# Altium PCB Electrode_Ribbon_PCB_v3.1.PcbDoc (part 1 of 5)
Units mil, origin at the board's own origin, x right, y up, seen from the top; angles counter-clockwise.
Board outline 8303.83 x 5482.84 mil, 2 copper layers (Top Layer, Bottom Layer), stack 3.556 mil thick; 265 components, 171 nets, 720 pads, 346 vias.
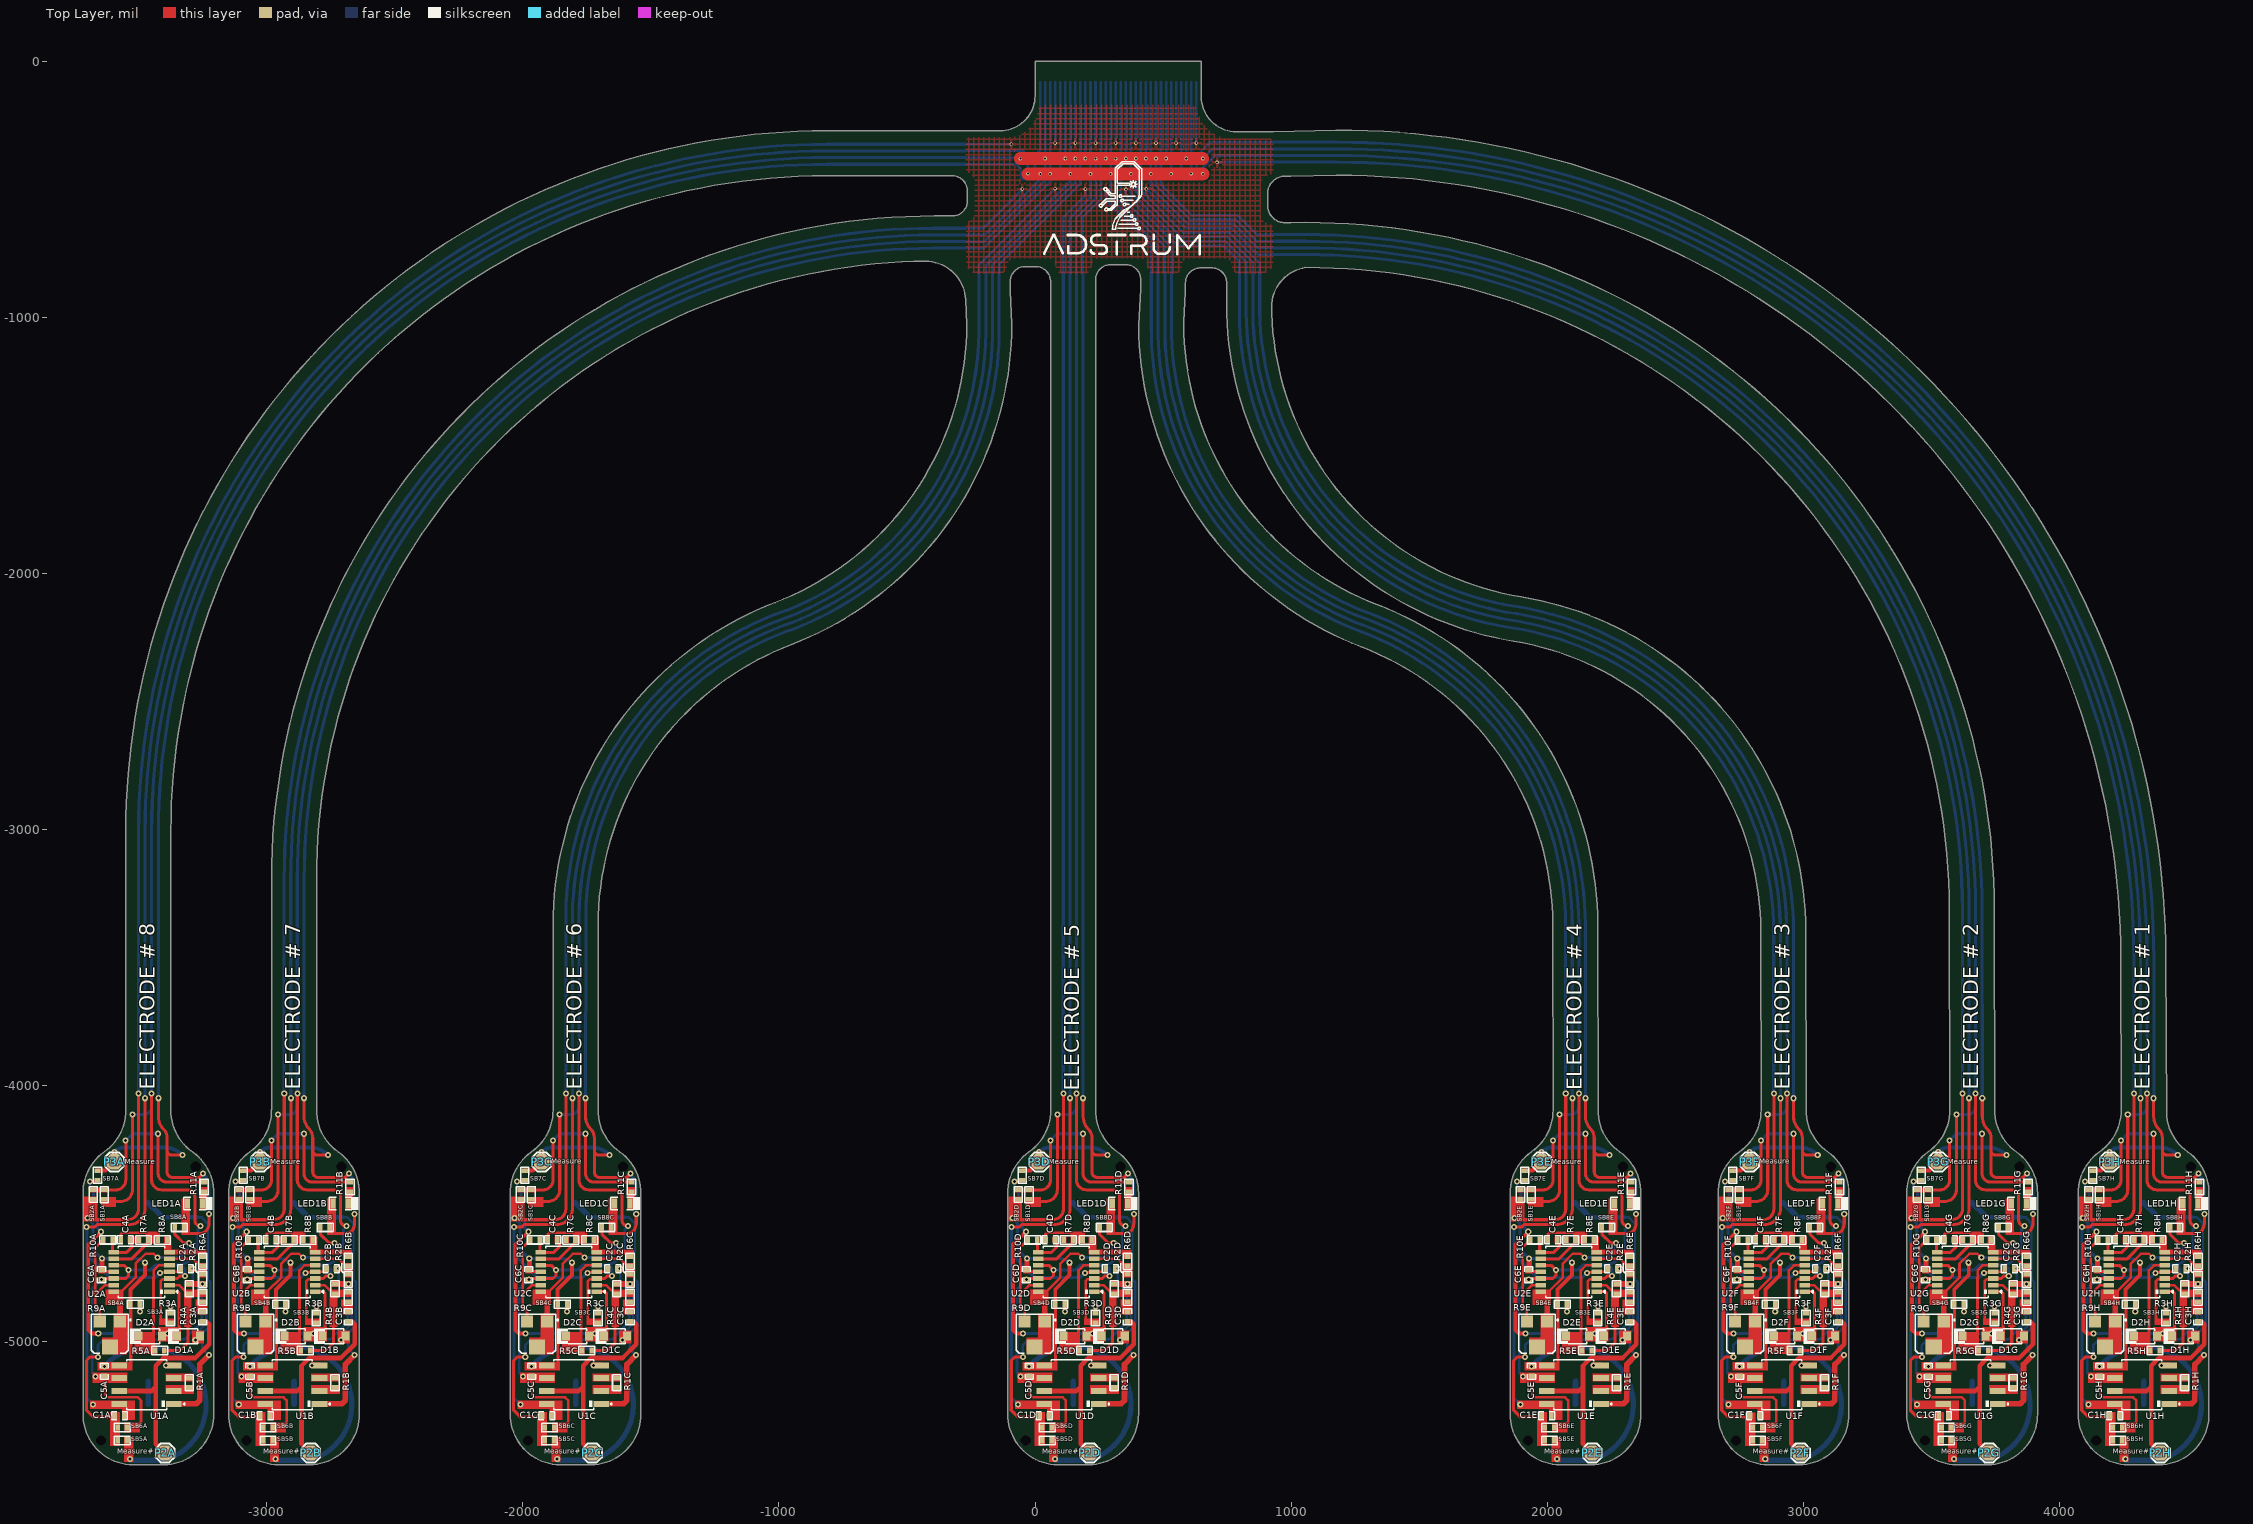
[diagram p0: Top Layer view]
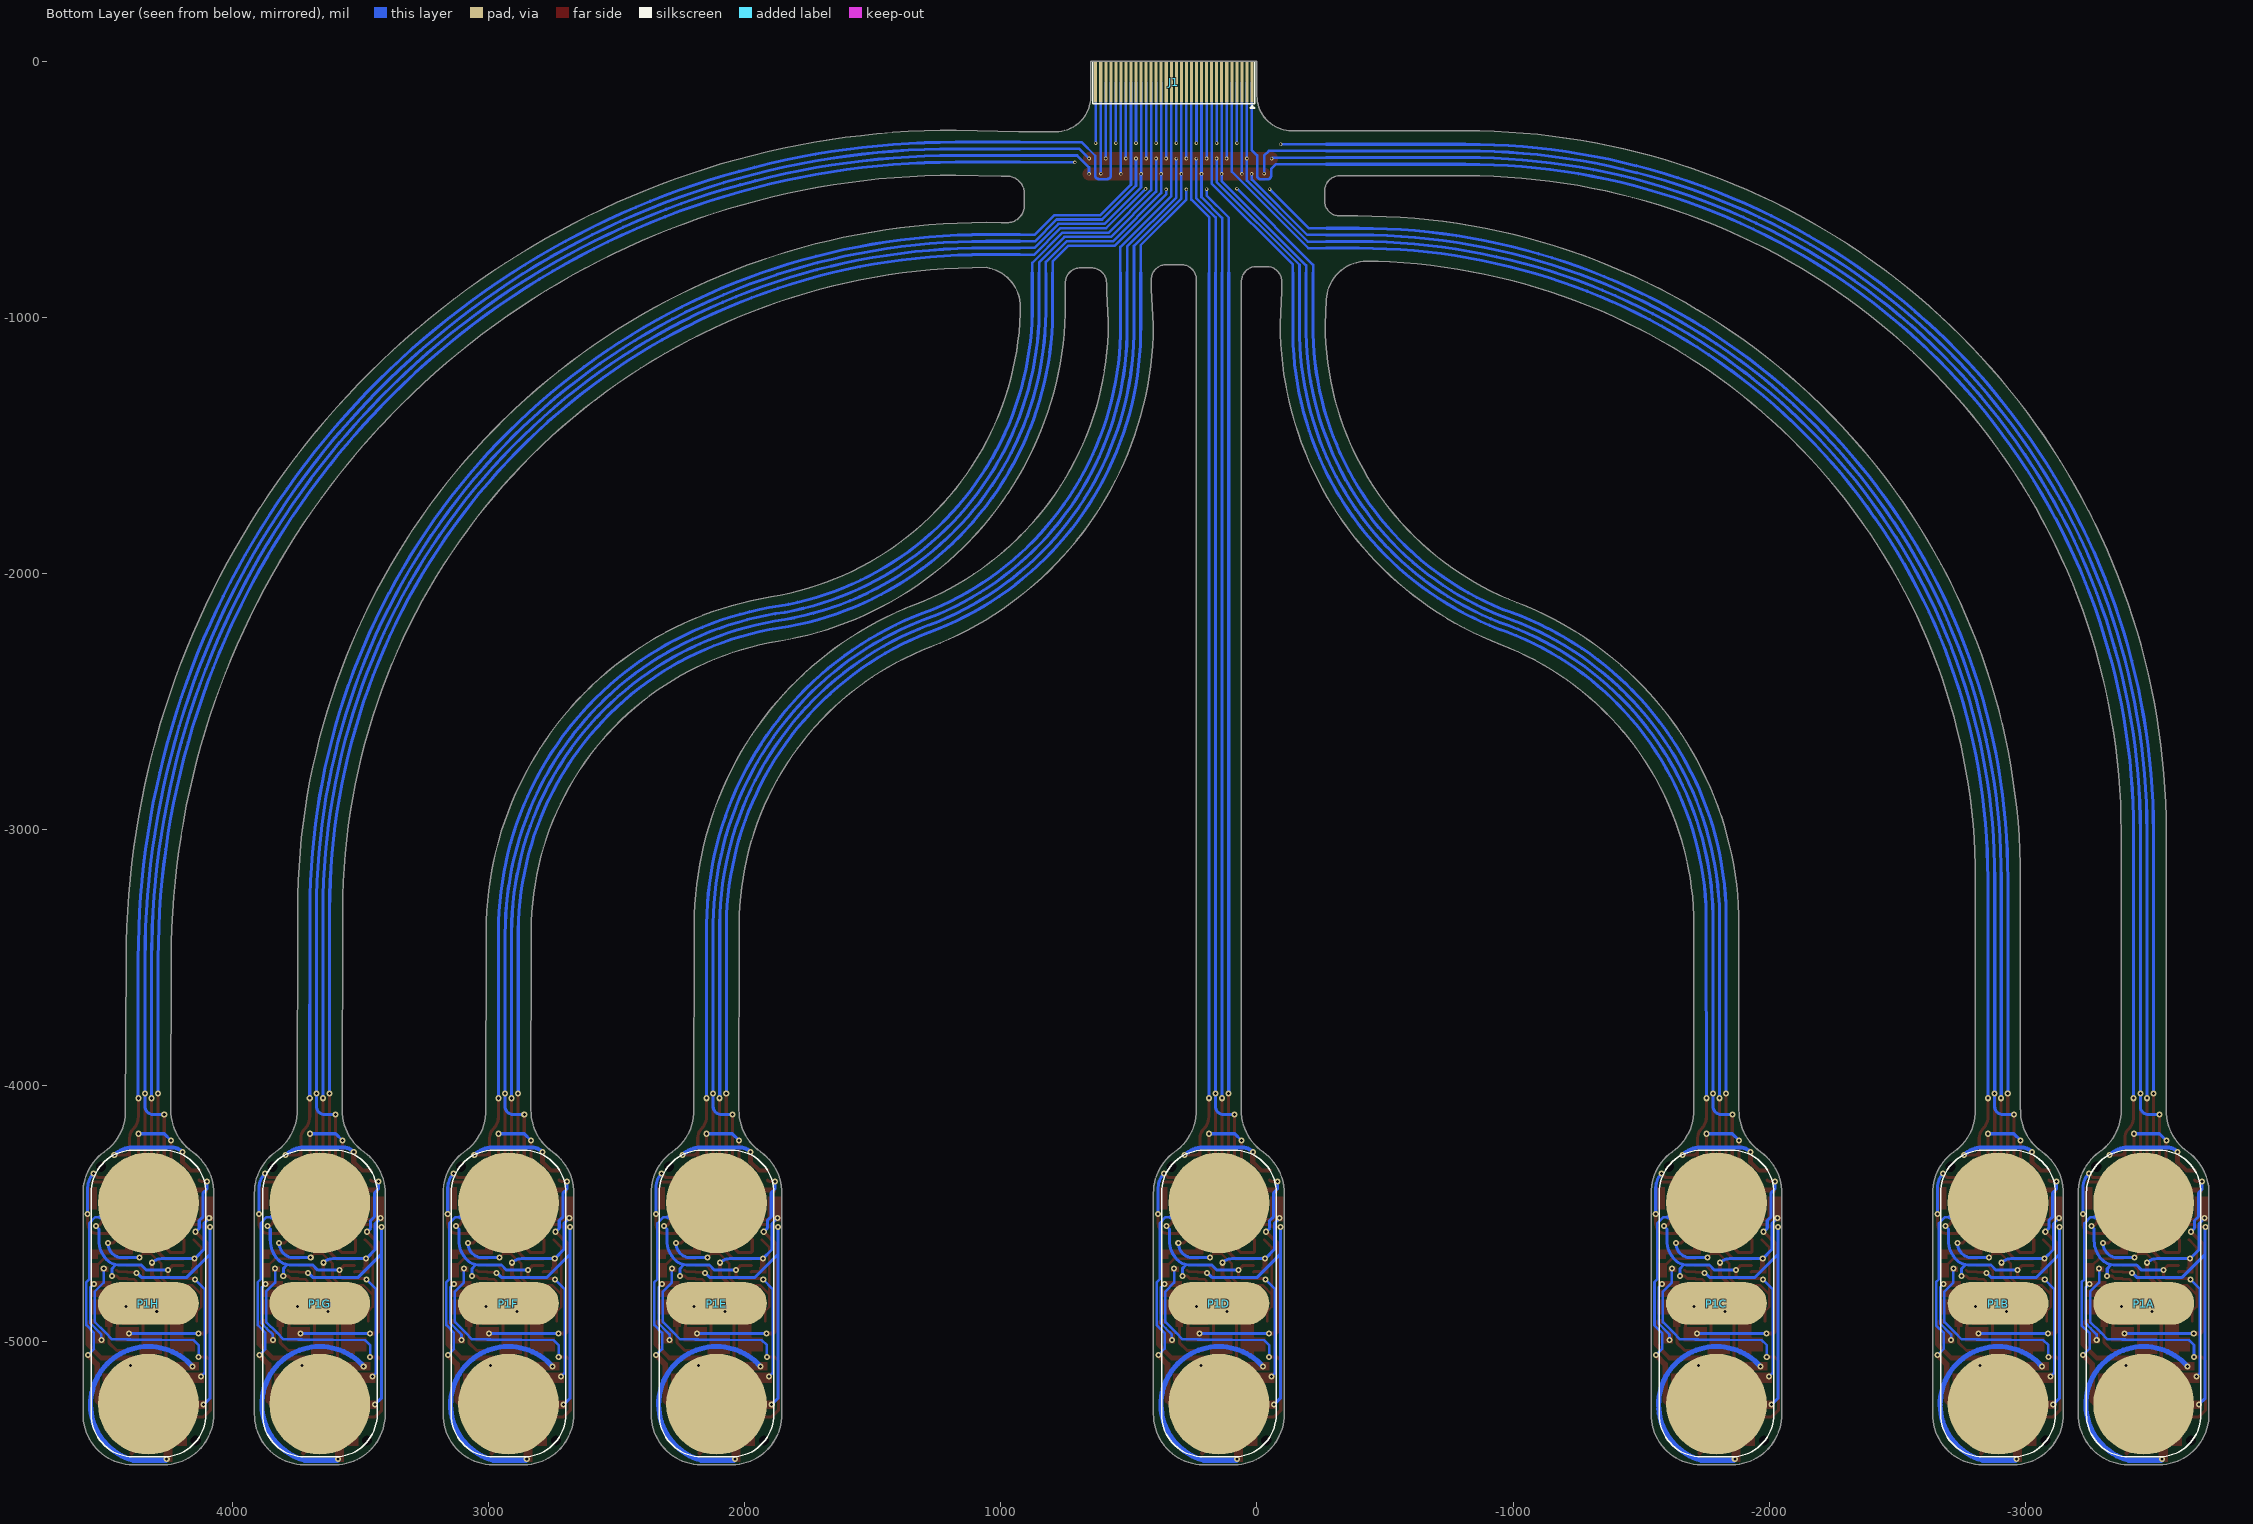
[diagram p1: Bottom Layer view, seen from below]
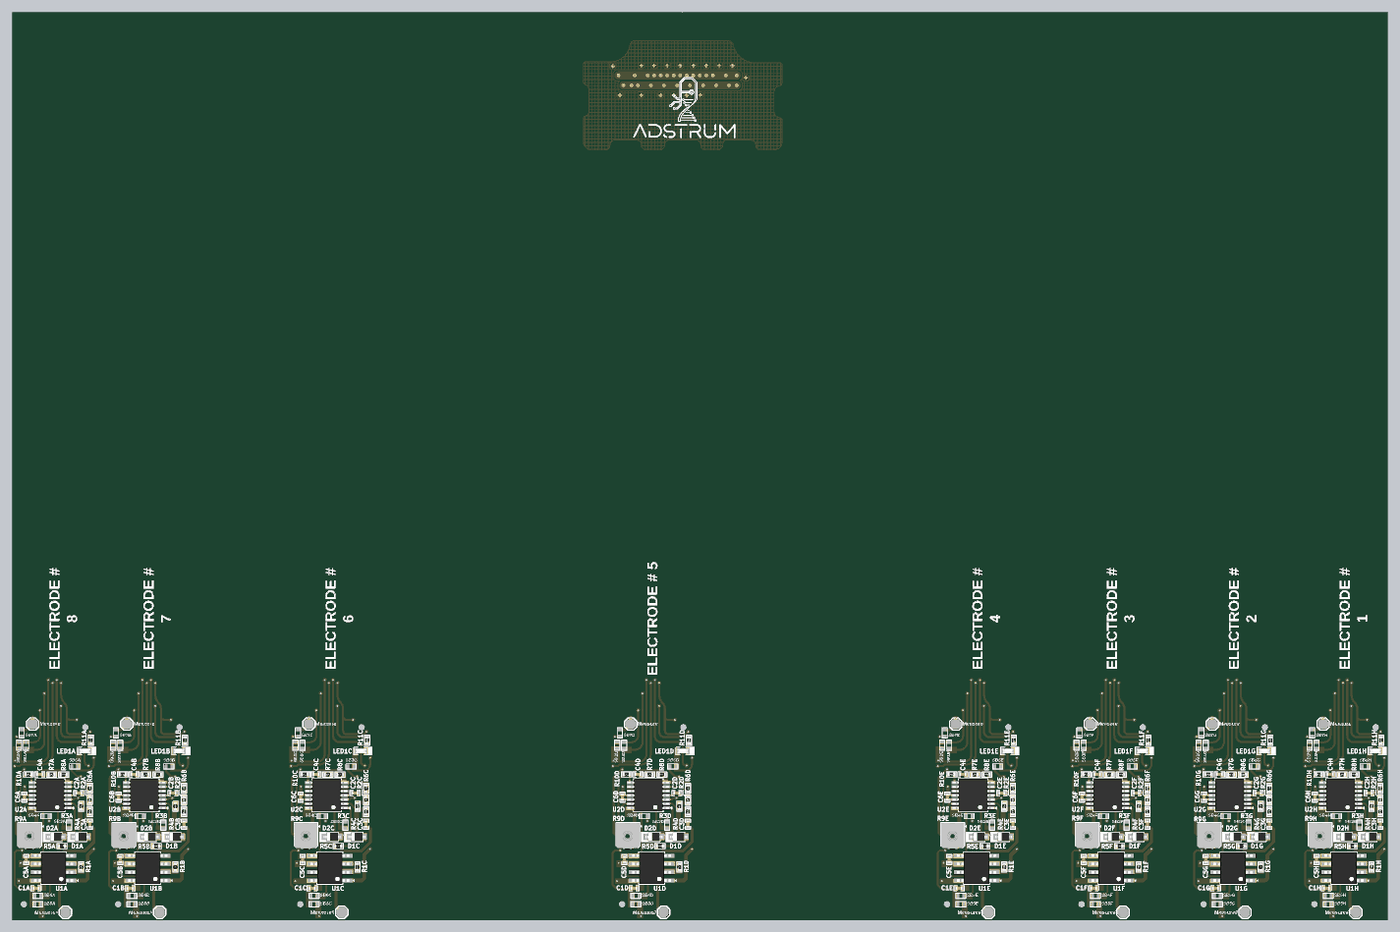
[diagram p5: 3D render of the assembled board from above, using the file's embedded part models]

## Layer stack, top to bottom
Top Solder: solder mask 0.5, Solder Resist, Dk 3.5
Top Layer: signal copper 1.378
Dielectric 1: dielectric 0.8, Flex, Dk 4.8
Bottom Layer: signal copper 1.378
Bottom Solder: solder mask 0.5, Solder Resist, Dk 3.5

## Board outline
-2833.54,-5482.84 ccw(c-2835.75,-5286) -2638.92,-5283.79 -2638.92,-4423.32 ccw(c-2835.73,-4421.11) -2720.72,-4261.39 -2720.78,-4261.47 cw(c-2609.33,-4099.22) -2764.51,-4220.31 cw(c-2609.34,-4099.22) -2806.15,-4097.01 -2806.16,-4097.01 -2806.16,-3194.47 cw(c-392.86,-3194.47) -519.84,-784.51 cw(c-413.65,-3194.12) -428.89,-782.22 cw(c-427.89,-939.69) -270.55,-933.27 -266.62,-1029.33 cw(c-1432.71,-1026.15) -1015.45,-2115.03 ccw(c-532.36,-3375.64) -1882.37,-3375.61 -1882.37,-4097.01 -1882.38,-4097.01 cw(c-2079.19,-4099.22) -1967.75,-4261.46 -1967.81,-4261.39 ccw(c-1852.8,-4421.11) -2049.61,-4423.33 -2049.62,-5283.78 ccw(c-1852.78,-5286) -1854.99,-5482.84 -1733.76,-5482.84 ccw(c-1735.97,-5286) -1539.13,-5283.79 -1539.13,-4423.32 ccw(c-1735.95,-4421.11) -1620.93,-4261.39 -1620.99,-4261.47 cw(c-1509.55,-4099.22) -1664.73,-4220.31 cw(c-1509.55,-4099.22) -1706.37,-4097.01 -1706.38,-4097.01 -1706.38,-3375.61 cw(c-532.36,-3375.64) -952.48,-2279.36 ccw(c-1432.71,-1026.15) -90.63,-1027.62 -90.63,-1025.87 -95.84,-898.28 -96.25,-854.66 cw(c-37.62,-861.7) -37.62,-802.64 1.79,-802.64 cw(c1.79,-861.7) 60.42,-854.66 60.84,-856.23 60.84,-861.23 60.84,-861.7 60.84,-877.23 61.11,-4097.01 cw(c-135.71,-4099.22) 19.46,-4220.31 cw(c-135.71,-4099.22) -24.27,-4261.46 -24.33,-4261.38 ccw(c90.69,-4421.11) -106.13,-4423.33 -106.14,-5283.78 ccw(c90.7,-5286) 88.49,-5482.84 209.72,-5482.84 ccw(c207.51,-5286) 404.35,-5283.79 404.35,-4423.32 ccw(c207.53,-4421.11) 322.55,-4261.38 322.48,-4261.45 cw(c433.91,-4099.24) 278.76,-4220.31 cw(c433.91,-4099.23) 237.12,-4097.02 236.83,-890.88 236.83,-851.19 237.25,-847.26 cw(c295.88,-854.3) 295.88,-795.24 353.84,-795.24 cw(c353.84,-854.3) 412.47,-847.26 412.14,-890.88 404.35,-1030.77 404.38,-1033.77 ccw(c1761.31,-1021.43) 1274.07,-2287.93 1274.18,-2287.97 cw(c857.44,-3375.43) 2022.01,-3373.45 2023.27,-4097.01 cw(c1826.45,-4099.22) 1937.89,-4261.46 1937.84,-4261.38 ccw(c2052.85,-4421.11) 1856.03,-4423.33 1856.03,-5283.78 ccw(c2052.87,-5286) 2050.65,-5482.84 2171.89,-5482.84 ccw(c2169.68,-5286) 2366.52,-5283.79 2366.52,-4423.32 ccw(c2169.7,-4421.11) 2284.71,-4261.39 2284.66,-4261.47 cw(c2396.1,-4099.22) 2240.92,-4220.31 cw(c2396.1,-4099.22) 2199.28,-4097.01 2199.26,-4097.01 2198,-3373.14 ccw(c857.44,-3375.43) 1337.16,-2123.64 cw(c1761.31,-1021.43) 601.94,-1246.45 cw(c1770.23,-1025.96) 581.32,-1025.96 581.35,-1017.53 587.72,-903.14 587.72,-866.79 cw(c646.77,-866.79) 646.77,-807.74 689.71,-807.74 cw(c689.71,-866.79) 748.77,-866.79 748.77,-910.41 748.67,-910.41 748.14,-947.79 ccw(c2084.58,-947.28) 1869.87,-2266.36 cw(c1685.16,-3401.02) 2834.76,-3399.01 2835.98,-4097.02 cw(c2639.17,-4099.23) 2750.61,-4261.47 2750.55,-4261.39 ccw(c2865.56,-4421.12) 2668.75,-4423.34 2668.74,-5283.79 ccw(c2865.58,-5286) 2863.37,-5482.84 2984.6,-5482.84 ccw(c2982.39,-5286) 3179.23,-5283.79 3179.23,-4423.33 ccw(c2982.41,-4421.12) 3097.43,-4261.39 3097.37,-4261.47 cw(c3208.81,-4099.23) 3053.63,-4220.32 cw(c3208.81,-4099.23) 3011.99,-4097.02 3011.97,-4097.01 3010.75,-3398.7 ccw(c1685.17,-3401.02) 1898.14,-2092.66 cw(c2084.58,-947.29) 924.13,-947.72 cw(c1080.95,-962.16) 1057.62,-806.42 cw(c1058.16,-3319.61) 3571.35,-3315.17 3572.73,-4097.01 cw(c3375.92,-4099.22) 3487.36,-4261.46 3487.3,-4261.38 ccw(c3602.31,-4421.11) 3405.5,-4423.33 3405.49,-5283.78 ccw(c3602.33,-5286) 3600.12,-5482.84 3721.35,-5482.84 ccw(c3719.14,-5286) 3915.98,-5283.79 3915.98,-4423.32 ccw(c3719.16,-4421.11) 3834.18,-4261.38 3834.12,-4261.46 cw(c3945.56,-4099.22) 3790.38,-4220.31 cw(c3945.56,-4099.22) 3748.74,-4097.01 3748.72,-4096.99 3747.34,-3314.86 ccw(c1058.16,-3319.61) 1057.58,-630.43 ccw(c1057.58,-630.43) 1057.58,-630.42 998.92,-631.38 970.55,-631.38 cw(c976.64,-563.33) 908.32,-563.33 908.32,-518.39 cw(c976.64,-518.39) 970.72,-450.33 998.92,-450.33 1176.84,-445.79 cw(c1176.53,-3510.43) 4241.17,-3505.07 4242.21,-4097.01 cw(c4045.39,-4099.22) 4156.83,-4261.47 4156.77,-4261.39 ccw(c4271.79,-4421.11) 4074.97,-4423.33 4074.96,-5283.78 ccw(c4271.8,-5286) 4269.59,-5482.84 4390.83,-5482.84 ccw(c4388.61,-5286) 4585.45,-5283.79 4585.45,-4423.32 ccw(c4388.64,-4421.11) 4503.65,-4261.39 4503.36,-4261.31 cw(c4612.91,-4101.83) 4459.95,-4220.31 cw(c4612.91,-4101.82) 4419.52,-4107.78 4417.16,-3504.77 ccw(c1176.53,-3510.43) 1175.63,-269.8 1174.58,-269.8 929.91,-276.04 785.84,-276.04 cw(c785.84,-139.92) 649.72,-139.93 649.72,0 0,0 0,-136.12 cw(c-136.12,-136.12) -136.12,-272.24 -814.09,-272.24 ccw(c-814.15,-3009.22) -3551.13,-3010.26 -3551.13,-4097.01 ccw(c-3551.13,-4097.02) -3551.14,-4097.01 cw(c-3747.95,-4099.22) -3636.51,-4261.46 -3636.57,-4261.39 ccw(c-3521.56,-4421.11) -3718.37,-4423.33 -3718.38,-5283.79 ccw(c-3521.54,-5286) -3523.75,-5482.84 -3402.52,-5482.84 ccw(c-3404.73,-5286) -3207.89,-5283.79 -3207.89,-4423.32 ccw(c-3404.71,-4421.11) -3289.69,-4261.39 -3289.75,-4261.47 cw(c-3178.31,-4099.22) -3333.49,-4220.31 cw(c-3178.31,-4099.22) -3375.13,-4097.01 -3375.14,-4097.01 -3375.14,-3009.22 cw(c-814.15,-3009.22) -814.09,-448.23 -323.17,-448.23 cw(c-323.17,-507.28) -264.12,-507.28 -264.12,-546.12 cw(c-323.17,-546.12) -323.17,-605.18 -392.9,-605.18 ccw(c-392.86,-3194.47) -2982.15,-3194.47 -2982.15,-4097.01 -2982.16,-4097.01 cw(c-3178.98,-4099.22) -3067.54,-4261.46 -3067.6,-4261.39 ccw(c-2952.58,-4421.11) -3149.4,-4423.33 -3149.4,-5283.78 ccw(c-2952.56,-5286) -2954.78,-5482.84

## Design rules (kind name [scope] priority, off if disabled: settings)
Clearance [All] p1: gap=6 ignorepadtopadclearanceinfootprint=FALSE except(4: Arc-SMDPad Track-SMDPad SMDPad-SMDPad)
MinimumSolderMaskSliver [All] p1: minsoldermaskwidth=0
PolygonConnect [All] p1: connectstyle=Relief reliefconductorwidth=10 reliefentries=4 polygonreliefangle="90 Angle" airgapwidth=10
RoutingVias [All] p1: holewidth=11.81 width=23.62 viastyle="Through Hole" minholewidth=7.87 minwidth=13.78 maxholewidth=31.5 maxwidth=62.99
SilkToSilkClearance [All] p1: silktosilkclearance=0
SilkToSolderMaskClearance [IsPad] p1: minsilkscreentomaskgap=0 clearancetoexposedcopper=TRUE
SolderMaskExpansion [All] p1: expansion=4 istentingtop=FALSE
Width [All] p1: maxlimit=50 minlimit=10 preferedwidth=15 minimp=50.000000 maximp=50.000000 favimp=50.000000
27 further rules are at their usual default settings.

## Classes and differential pairs
channel class OpAmp_Sheet: "Electrode #1" "Electrode #2" "Electrode #3" "Electrode #4" "Electrode #5" "Electrode #6" "Electrode #7" "Electrode #8"
component class "Electrode #8": C1H C2H C3H C4H C5H C6H D1H D2H LED1H P1H P2H P3H R1H R2H R3H R4H R5H R6H R7H R8H R9H R10H R11H SB1H SB2H SB3H SB4H SB5H SB6H SB7H SB8H U1H U2H
component class "Electrode #7": C1G C2G C3G C4G C5G C6G D1G D2G LED1G P1G P2G P3G R1G R2G R3G R4G R5G R6G R7G R8G R9G R10G R11G SB1G SB2G SB3G SB4G SB5G SB6G SB7G SB8G U1G U2G
component class "Electrode #6": C1F C2F C3F C4F C5F C6F D1F D2F LED1F P1F P2F P3F R1F R2F R3F R4F R5F R6F R7F R8F R9F R10F R11F SB1F SB2F SB3F SB4F SB5F SB6F SB7F SB8F U1F U2F
component class "Electrode #5": C1E C2E C3E C4E C5E C6E D1E D2E LED1E P1E P2E P3E R1E R2E R3E R4E R5E R6E R7E R8E R9E R10E R11E SB1E SB2E SB3E SB4E SB5E SB6E SB7E SB8E U1E U2E
component class "Electrode #4": C1D C2D C3D C4D C5D C6D D1D D2D LED1D P1D P2D P3D R1D R2D R3D R4D R5D R6D R7D R8D R9D R10D R11D SB1D SB2D SB3D SB4D SB5D SB6D SB7D SB8D U1D U2D
component class "Electrode #3": C1C C2C C3C C4C C5C C6C D1C D2C LED1C P1C P2C P3C R1C R2C R3C R4C R5C R6C R7C R8C R9C R10C R11C SB1C SB2C SB3C SB4C SB5C SB6C SB7C SB8C U1C U2C
component class "Electrode #2": C1B C2B C3B C4B C5B C6B D1B D2B LED1B P1B P2B P3B R1B R2B R3B R4B R5B R6B R7B R8B R9B R10B R11B SB1B SB2B SB3B SB4B SB5B SB6B SB7B SB8B U1B U2B
component class "Electrode #1": C1A C2A C3A C4A C5A C6A D1A D2A LED1A P1A P2A P3A R1A R2A R3A R4A R5A R6A R7A R8A R9A R10A R11A SB1A SB2A SB3A SB4A SB5A SB6A SB7A SB8A U1A U2A
component class Main_Sheet: J1

## Components (designator, comment, footprint, x,y, rotation, side; value= is the part's Value field where it differs from the comment)
C1A "1uF" Cap-0402 -3575.89,-5291.78 r180 top locked (schematic designator C1)
C1B "1uF" Cap-0402 -3006.92,-5291.78 r180 top locked (schematic designator C1)
C1C "1uF" Cap-0402 -1907.13,-5291.78 r180 top locked (schematic designator C1)
C1D "1uF" Cap-0402 36.35,-5291.78 r180 top locked (schematic designator C1)
C1E "1uF" Cap-0402 1998.52,-5291.78 r180 top locked (schematic designator C1)
C1F "1uF" Cap-0402 2811.23,-5291.79 r180 top locked (schematic designator C1)
C1G "1uF" Cap-0402 3547.98,-5291.78 r180 top locked (schematic designator C1)
C1H "1uF" Cap-0402 4217.45,-5291.78 r180 top locked (schematic designator C1)
C2A "0.1uF" Cap-0402 -3317.89,-4716.78 r0 top locked (schematic designator C2)
C2B "0.1uF" Cap-0402 -2748.92,-4716.78 r0 top locked (schematic designator C2)
C2C "0.1uF" Cap-0402 -1649.13,-4716.78 r0 top locked (schematic designator C2)
C2D "0.1uF" Cap-0402 294.35,-4716.78 r0 top locked (schematic designator C2)
C2E "0.1uF" Cap-0402 2256.52,-4716.78 r0 top locked (schematic designator C2)
C2F "0.1uF" Cap-0402 3069.23,-4716.79 r0 top locked (schematic designator C2)
C2G "0.1uF" Cap-0402 3805.98,-4716.78 r0 top locked (schematic designator C2)
C2H "0.1uF" Cap-0402 4475.45,-4716.78 r0 top locked (schematic designator C2)
C3A "10nF" Cap-0402 -3250.87,-4904.78 r90 top locked (schematic designator C3)
C3B "10nF" Cap-0402 -2681.9,-4904.78 r90 top locked (schematic designator C3)
C3C "10nF" Cap-0402 -1582.11,-4904.78 r90 top locked (schematic designator C3)
C3D "10nF" Cap-0402 361.37,-4904.78 r90 top locked (schematic designator C3)
C3E "10nF" Cap-0402 2323.54,-4904.78 r90 top locked (schematic designator C3)
C3F "10nF" Cap-0402 3136.25,-4904.79 r90 top locked (schematic designator C3)
C3G "10nF" Cap-0402 3873,-4904.78 r90 top locked (schematic designator C3)
C3H "10nF" Cap-0402 4542.47,-4904.78 r90 top locked (schematic designator C3)
C4A "1uF" Cap-0402 -3552.87,-4603.78 r180 top locked (schematic designator C4)
C4B "1uF" Cap-0402 -2983.9,-4603.78 r180 top locked (schematic designator C4)
C4C "1uF" Cap-0402 -1884.11,-4603.78 r180 top locked (schematic designator C4)
C4D "1uF" Cap-0402 59.37,-4603.78 r180 top locked (schematic designator C4)
C4E "1uF" Cap-0402 2021.54,-4603.78 r180 top locked (schematic designator C4)
C4F "1uF" Cap-0402 2834.25,-4603.79 r180 top locked (schematic designator C4)
C4G "1uF" Cap-0402 3571,-4603.78 r180 top locked (schematic designator C4)
C4H "1uF" Cap-0402 4240.47,-4603.78 r180 top locked (schematic designator C4)
C5A "1uF" Cap-0402 -3634.89,-5117.78 r270 top locked (schematic designator C5)
C5B "1uF" Cap-0402 -3065.92,-5117.78 r270 top locked (schematic designator C5)
C5C "1uF" Cap-0402 -1966.13,-5117.78 r270 top locked (schematic designator C5)
C5D "1uF" Cap-0402 -22.65,-5117.78 r270 top locked (schematic designator C5)
C5E "1uF" Cap-0402 1939.52,-5117.78 r270 top locked (schematic designator C5)
C5F "1uF" Cap-0402 2752.23,-5117.79 r270 top locked (schematic designator C5)
C5G "1uF" Cap-0402 3488.98,-5117.78 r270 top locked (schematic designator C5)
C5H "1uF" Cap-0402 4158.45,-5117.78 r270 top locked (schematic designator C5)
C6A "0.1uF" Cap-0402 -3645.89,-4740.78 r270 top locked (schematic designator C6)
C6B "0.1uF" Cap-0402 -3076.92,-4740.78 r270 top locked (schematic designator C6)
C6C "0.1uF" Cap-0402 -1977.13,-4740.78 r270 top locked (schematic designator C6)
C6D "0.1uF" Cap-0402 -33.65,-4740.78 r270 top locked (schematic designator C6)
C6E "0.1uF" Cap-0402 1928.52,-4740.78 r270 top locked (schematic designator C6)
C6F "0.1uF" Cap-0402 2741.23,-4740.79 r270 top locked (schematic designator C6)
C6G "0.1uF" Cap-0402 3477.98,-4740.78 r270 top locked (schematic designator C6)
C6H "0.1uF" Cap-0402 4147.45,-4740.78 r270 top locked (schematic designator C6)
D1A "1N4148WS" SOD-323 -3306.89,-4980.78 r0 top locked (schematic designator D1)
D1B "1N4148WS" SOD-323 -2737.92,-4980.78 r0 top locked (schematic designator D1)
D1C "1N4148WS" SOD-323 -1638.13,-4980.78 r0 top locked (schematic designator D1)
D1D "1N4148WS" SOD-323 305.35,-4980.78 r0 top locked (schematic designator D1)
D1E "1N4148WS" SOD-323 2267.52,-4980.78 r0 top locked (schematic designator D1)
D1F "1N4148WS" SOD-323 3080.23,-4980.79 r0 top locked (schematic designator D1)
D1G "1N4148WS" SOD-323 3816.98,-4980.78 r0 top locked (schematic designator D1)
D1H "1N4148WS" SOD-323 4486.45,-4980.78 r0 top locked (schematic designator D1)
D2A "1N4148WS" SOD-323 -3455.89,-4980.78 r0 top locked (schematic designator D2)
D2B "1N4148WS" SOD-323 -2886.92,-4980.78 r0 top locked (schematic designator D2)
D2C "1N4148WS" SOD-323 -1787.13,-4980.78 r0 top locked (schematic designator D2)
D2D "1N4148WS" SOD-323 156.35,-4980.78 r0 top locked (schematic designator D2)
D2E "1N4148WS" SOD-323 2118.52,-4980.78 r0 top locked (schematic designator D2)
D2F "1N4148WS" SOD-323 2931.23,-4980.79 r0 top locked (schematic designator D2)
D2G "1N4148WS" SOD-323 3667.98,-4980.78 r0 top locked (schematic designator D2)
D2H "1N4148WS" SOD-323 4337.45,-4980.78 r0 top locked (schematic designator D2)
J1 "32 pin Ribbon Pads" "32 pin Ribbon Pads." 324.87,-83.01 r180 bottom locked
LED1A "Orange" LED-0603 -3280.87,-4462.78 r0 top locked (schematic designator LED1)
LED1B "Orange" LED-0603 -2711.9,-4462.78 r0 top locked (schematic designator LED1)
LED1C "Orange" LED-0603 -1612.11,-4462.78 r0 top locked (schematic designator LED1)
LED1D "Orange" LED-0603 331.37,-4462.78 r0 top locked (schematic designator LED1)
LED1E "Orange" LED-0603 2293.54,-4462.78 r0 top locked (schematic designator LED1)
LED1F "Orange" LED-0603 3106.25,-4462.79 r0 top locked (schematic designator LED1)
LED1G "Orange" LED-0603 3843,-4462.78 r0 top locked (schematic designator LED1)
LED1H "Orange" LED-0603 4512.47,-4462.78 r0 top locked (schematic designator LED1)
P1A "SEMG Sensor" sEMG-sensor -3463.38,-4853.05 r0 bottom locked (schematic designator P1)
P1B "SEMG Sensor" sEMG-sensor -2894.41,-4853.05 r0 bottom (schematic designator P1)
P1C "SEMG Sensor" sEMG-sensor -1794.62,-4853.05 r0 bottom locked (schematic designator P1)
P1D "SEMG Sensor" sEMG-sensor 148.86,-4853.05 r0 bottom locked (schematic designator P1)
P1E "SEMG Sensor" sEMG-sensor 2111.03,-4853.05 r0 bottom locked (schematic designator P1)
P1F "SEMG Sensor" sEMG-sensor 2923.74,-4853.06 r0 bottom locked (schematic designator P1)
P1G "SEMG Sensor" sEMG-sensor 3660.49,-4853.05 r0 bottom locked (schematic designator P1)
P1H "SEMG Sensor" sEMG-sensor 4329.96,-4853.05 r0 bottom locked (schematic designator P1)
P2A "Test Point" Test-point -3397.89,-5436.78 r180 top locked (schematic designator P2)
P2B "Test Point" Test-point -2828.92,-5436.78 r180 top locked (schematic designator P2)
P2C "Test Point" Test-point -1729.13,-5436.78 r180 top locked (schematic designator P2)
P2D "Test Point" Test-point 214.35,-5436.78 r180 top locked (schematic designator P2)
P2E "Test Point" Test-point 2176.52,-5436.78 r180 top locked (schematic designator P2)
P2F "Test Point" Test-point 2989.23,-5436.79 r180 top locked (schematic designator P2)
P2G "Test Point" Test-point 3725.98,-5436.78 r180 top locked (schematic designator P2)
P2H "Test Point" Test-point 4395.45,-5436.78 r180 top locked (schematic designator P2)
P3A "Test Point" Test-point -3595.89,-4299.78 r180 top locked (schematic designator P3)
P3B "Test Point" Test-point -3026.92,-4299.78 r180 top locked (schematic designator P3)
P3C "Test Point" Test-point -1927.13,-4299.78 r180 top locked (schematic designator P3)
P3D "Test Point" Test-point 16.35,-4299.78 r180 top locked (schematic designator P3)
P3E "Test Point" Test-point 1978.52,-4299.78 r180 top locked (schematic designator P3)
P3F "Test Point" Test-point 2791.23,-4299.79 r180 top locked (schematic designator P3)
P3G "Test Point" Test-point 3527.98,-4299.78 r180 top locked (schematic designator P3)
P3H "Test Point" Test-point 4197.45,-4299.78 r180 top locked (schematic designator P3)
R1A "240R" Res-0402 -3302.89,-5162.78 r270 top locked (schematic designator R1)
R1B "240R" Res-0402 -2733.92,-5162.78 r270 top locked (schematic designator R1)
R1C "240R" Res-0402 -1634.13,-5162.78 r270 top locked (schematic designator R1)
R1D "240R" Res-0402 309.35,-5162.78 r270 top locked (schematic designator R1)
R1E "240R" Res-0402 2271.52,-5162.78 r270 top locked (schematic designator R1)
R1F "240R" Res-0402 3084.23,-5162.79 r270 top locked (schematic designator R1)
R1G "240R" Res-0402 3820.98,-5162.78 r270 top locked (schematic designator R1)
R1H "240R" Res-0402 4490.45,-5162.78 r270 top locked (schematic designator R1)
R2A "150K" Res-0402 -3250.87,-4757.78 r270 top locked (schematic designator R2)
R2B "150K" Res-0402 -2681.9,-4757.78 r270 top locked (schematic designator R2)
R2C "150K" Res-0402 -1582.11,-4757.78 r270 top locked (schematic designator R2)
R2D "150K" Res-0402 361.37,-4757.78 r270 top locked (schematic designator R2)
R2E "150K" Res-0402 2323.54,-4757.78 r270 top locked (schematic designator R2)
R2F "150K" Res-0402 3136.25,-4757.79 r270 top locked (schematic designator R2)
R2G "150K" Res-0402 3873,-4757.78 r270 top locked (schematic designator R2)
R2H "150K" Res-0402 4542.47,-4757.78 r270 top locked (schematic designator R2)
R3A "150K" Res-0402 -3302.89,-4795.78 r90 top locked (schematic designator R3)
R3B "150K" Res-0402 -2733.92,-4795.78 r90 top locked (schematic designator R3)
R3C "150K" Res-0402 -1634.13,-4795.78 r90 top locked (schematic designator R3)
R3D "150K" Res-0402 309.35,-4795.78 r90 top locked (schematic designator R3)
R3E "150K" Res-0402 2271.52,-4795.78 r90 top locked (schematic designator R3)
R3F "150K" Res-0402 3084.23,-4795.79 r90 top locked (schematic designator R3)
R3G "150K" Res-0402 3820.98,-4795.78 r90 top locked (schematic designator R3)
R3H "150K" Res-0402 4490.45,-4795.78 r90 top locked (schematic designator R3)
R4A "150K" Res-0402 -3250.87,-4828.28 r270 top locked (schematic designator R4)
R4B "150K" Res-0402 -2681.9,-4828.28 r270 top locked (schematic designator R4)
R4C "150K" Res-0402 -1582.11,-4828.28 r270 top locked (schematic designator R4)
R4D "150K" Res-0402 361.37,-4828.28 r270 top locked (schematic designator R4)
R4E "150K" Res-0402 2323.54,-4828.28 r270 top locked (schematic designator R4)
R4F "150K" Res-0402 3136.25,-4828.29 r270 top locked (schematic designator R4)
R4G "150K" Res-0402 3873,-4828.28 r270 top locked (schematic designator R4)
R4H "150K" Res-0402 4542.47,-4828.28 r270 top locked (schematic designator R4)
R5A "150K" Res-0402 -3418.89,-5036.78 r180 top locked (schematic designator R5)
R5B "150K" Res-0402 -2849.92,-5036.78 r180 top locked (schematic designator R5)
R5C "150K" Res-0402 -1750.13,-5036.78 r180 top locked (schematic designator R5)
R5D "150K" Res-0402 193.35,-5036.78 r180 top locked (schematic designator R5)
R5E "150K" Res-0402 2155.52,-5036.78 r180 top locked (schematic designator R5)
R5F "150K" Res-0402 2968.23,-5036.79 r180 top locked (schematic designator R5)
R5G "150K" Res-0402 3704.98,-5036.78 r180 top locked (schematic designator R5)
R5H "150K" Res-0402 4374.45,-5036.78 r180 top locked (schematic designator R5)
R6A "150K" Res-0402 -3250.87,-4687.78 r90 top locked (schematic designator R6)
R6B "150K" Res-0402 -2681.9,-4687.78 r90 top locked (schematic designator R6)
R6C "150K" Res-0402 -1582.11,-4687.78 r90 top locked (schematic designator R6)
R6D "150K" Res-0402 361.37,-4687.78 r90 top locked (schematic designator R6)
R6E "150K" Res-0402 2323.54,-4687.78 r90 top locked (schematic designator R6)
R6F "150K" Res-0402 3136.25,-4687.79 r90 top locked (schematic designator R6)
R6G "150K" Res-0402 3873,-4687.78 r90 top locked (schematic designator R6)
R6H "150K" Res-0402 4542.47,-4687.78 r90 top locked (schematic designator R6)
R7A "80.6K" Res0402 -3481.87,-4604.78 r180 top locked (schematic designator R7)
R7B "80.6K" Res0402 -2912.9,-4604.78 r180 top locked (schematic designator R7)
R7C "80.6K" Res0402 -1813.11,-4604.78 r180 top locked (schematic designator R7)
R7D "80.6K" Res0402 130.37,-4604.78 r180 top locked (schematic designator R7)
R7E "80.6K" Res0402 2092.54,-4604.78 r180 top locked (schematic designator R7)
R7F "80.6K" Res0402 2905.25,-4604.79 r180 top locked (schematic designator R7)
R7G "80.6K" Res0402 3642,-4604.78 r180 top locked (schematic designator R7)
R7H "80.6K" Res0402 4311.47,-4604.78 r180 top locked (schematic designator R7)
R8A "80.6K" Res0402 -3408.37,-4604.78 r0 top locked (schematic designator R8)
R8B "80.6K" Res0402 -2839.4,-4604.78 r0 top locked (schematic designator R8)
R8C "80.6K" Res0402 -1739.61,-4604.78 r0 top locked (schematic designator R8)
R8D "80.6K" Res0402 203.87,-4604.78 r0 top locked (schematic designator R8)
R8E "80.6K" Res0402 2166.04,-4604.78 r0 top locked (schematic designator R8)
R8F "80.6K" Res0402 2978.75,-4604.79 r0 top locked (schematic designator R8)
R8G "80.6K" Res0402 3715.5,-4604.78 r0 top locked (schematic designator R8)
R8H "80.6K" Res0402 4384.97,-4604.78 r0 top locked (schematic designator R8)
R9A "100K" TC33X-2-104E_ -3574.15,-4922.78 r180 top locked (schematic designator R9)
R9B "100K" TC33X-2-104E_ -3005.18,-4922.78 r180 top locked (schematic designator R9)
R9C "100K" TC33X-2-104E_ -1905.39,-4922.78 r180 top locked (schematic designator R9)
R9D "100K" TC33X-2-104E_ 38.09,-4922.78 r180 top locked (schematic designator R9)
R9E "100K" TC33X-2-104E_ 2000.26,-4922.78 r180 top locked (schematic designator R9)
R9F "100K" TC33X-2-104E_ 2812.97,-4922.79 r180 top locked (schematic designator R9)
R9G "100K" TC33X-2-104E_ 3549.72,-4922.78 r180 top locked (schematic designator R9)
R9H "100K" TC33X-2-104E_ 4219.19,-4922.78 r180 top locked (schematic designator R9)
R10A "1K" Res-0402 -3621.39,-4603.78 r0 top locked (schematic designator R10)
R10B "1K" Res-0402 -3052.42,-4603.78 r0 top locked (schematic designator R10)
R10C "1K" Res-0402 -1952.63,-4603.78 r0 top locked (schematic designator R10)
R10D "1K" Res-0402 -9.15,-4603.78 r0 top locked (schematic designator R10)
R10E "1K" Res-0402 1953.02,-4603.78 r0 top locked (schematic designator R10)
R10F "1K" Res-0402 2765.73,-4603.79 r0 top locked (schematic designator R10)
R10G "1K" Res-0402 3502.48,-4603.78 r0 top locked (schematic designator R10)
R10H "1K" Res-0402 4171.95,-4603.78 r0 top locked (schematic designator R10)
R11A "1K" Res-0402 -3244.89,-4397.78 r270 top locked (schematic designator R11)
R11B "1K" Res-0402 -2675.92,-4397.78 r270 top locked (schematic designator R11)
R11C "1K" Res-0402 -1576.13,-4397.78 r270 top locked (schematic designator R11)
R11D "1K" Res-0402 367.35,-4397.78 r270 top locked (schematic designator R11)
R11E "1K" Res-0402 2329.52,-4397.78 r270 top locked (schematic designator R11)
R11F "1K" Res-0402 3142.23,-4397.79 r270 top locked (schematic designator R11)
R11G "1K" Res-0402 3878.98,-4397.78 r270 top locked (schematic designator R11)
R11H "1K" Res-0402 4548.45,-4397.78 r270 top locked (schematic designator R11)
SB1A "Solder Bridge 0402" "Solder Bridge 0402" -3635.89,-4427.78 r90 top locked (schematic designator SB1)
SB1B "Solder Bridge 0402" "Solder Bridge 0402" -3066.92,-4427.78 r90 top locked (schematic designator SB1)
SB1C "Solder Bridge 0402" "Solder Bridge 0402" -1967.13,-4427.78 r90 top locked (schematic designator SB1)
SB1D "Solder Bridge 0402" "Solder Bridge 0402" -23.65,-4427.78 r90 top locked (schematic designator SB1)
SB1E "Solder Bridge 0402" "Solder Bridge 0402" 1938.52,-4427.78 r90 top (schematic designator SB1)
SB1F "Solder Bridge 0402" "Solder Bridge 0402" 2751.23,-4427.79 r90 top locked (schematic designator SB1)
SB1G "Solder Bridge 0402" "Solder Bridge 0402" 3487.98,-4427.78 r90 top locked (schematic designator SB1)
SB1H "Solder Bridge 0402" "Solder Bridge 0402" 4157.45,-4427.78 r90 top locked (schematic designator SB1)
SB2A "Solder Bridge 0402" "Solder Bridge 0402" -3678.12,-4427.42 r90 top locked (schematic designator SB2)
SB2B "Solder Bridge 0402" "Solder Bridge 0402" -3109.14,-4427.42 r90 top locked (schematic designator SB2)
SB2C "Solder Bridge 0402" "Solder Bridge 0402" -2009.36,-4427.42 r90 top locked (schematic designator SB2)
SB2D "Solder Bridge 0402" "Solder Bridge 0402" -65.87,-4427.42 r90 top locked (schematic designator SB2)
SB2E "Solder Bridge 0402" "Solder Bridge 0402" 1896.29,-4427.42 r90 top (schematic designator SB2)
SB2F "Solder Bridge 0402" "Solder Bridge 0402" 2709,-4427.42 r90 top locked (schematic designator SB2)
SB2G "Solder Bridge 0402" "Solder Bridge 0402" 3445.75,-4427.42 r90 top locked (schematic designator SB2)
SB2H "Solder Bridge 0402" "Solder Bridge 0402" 4115.23,-4427.42 r90 top locked (schematic designator SB2)
SB3A "Solder Bridge 0402" "Solder Bridge 0402" -3375.89,-4909.78 r270 top locked (schematic designator SB3)
SB3B "Solder Bridge 0402" "Solder Bridge 0402" -2806.92,-4909.78 r270 top locked (schematic designator SB3)
SB3C "Solder Bridge 0402" "Solder Bridge 0402" -1707.13,-4909.78 r270 top locked (schematic designator SB3)
SB3D "Solder Bridge 0402" "Solder Bridge 0402" 236.35,-4909.78 r270 top locked (schematic designator SB3)
SB3E "Solder Bridge 0402" "Solder Bridge 0402" 2198.52,-4909.78 r270 top locked (schematic designator SB3)
SB3F "Solder Bridge 0402" "Solder Bridge 0402" 3011.23,-4909.79 r270 top locked (schematic designator SB3)
SB3G "Solder Bridge 0402" "Solder Bridge 0402" 3747.98,-4909.78 r270 top locked (schematic designator SB3)
SB3H "Solder Bridge 0402" "Solder Bridge 0402" 4417.45,-4909.78 r270 top locked (schematic designator SB3)
SB4A "Solder Bridge 0402" "Solder Bridge 0402" -3514.89,-4855.78 r180 top locked (schematic designator SB4)
SB4B "Solder Bridge 0402" "Solder Bridge 0402" -2945.92,-4855.78 r180 top locked (schematic designator SB4)
SB4C "Solder Bridge 0402" "Solder Bridge 0402" -1846.13,-4855.78 r180 top locked (schematic designator SB4)
SB4D "Solder Bridge 0402" "Solder Bridge 0402" 97.35,-4855.78 r180 top locked (schematic designator SB4)
SB4E "Solder Bridge 0402" "Solder Bridge 0402" 2059.52,-4855.78 r180 top locked (schematic designator SB4)
SB4F "Solder Bridge 0402" "Solder Bridge 0402" 2872.23,-4855.79 r180 top locked (schematic designator SB4)
SB4G "Solder Bridge 0402" "Solder Bridge 0402" 3608.98,-4855.78 r180 top locked (schematic designator SB4)
SB4H "Solder Bridge 0402" "Solder Bridge 0402" 4278.45,-4855.78 r180 top locked (schematic designator SB4)
SB5A "Solder Bridge 0402" "Solder Bridge 0402" -3564.89,-5387.78 r0 top locked (schematic designator SB5)
SB5B "Solder Bridge 0402" "Solder Bridge 0402" -2995.92,-5387.78 r0 top locked (schematic designator SB5)
SB5C "Solder Bridge 0402" "Solder Bridge 0402" -1896.13,-5387.78 r0 top locked (schematic designator SB5)
SB5D "Solder Bridge 0402" "Solder Bridge 0402" 47.35,-5387.78 r0 top locked (schematic designator SB5)
SB5E "Solder Bridge 0402" "Solder Bridge 0402" 2009.52,-5387.78 r0 top locked (schematic designator SB5)
SB5F "Solder Bridge 0402" "Solder Bridge 0402" 2822.23,-5387.79 r0 top locked (schematic designator SB5)
SB5G "Solder Bridge 0402" "Solder Bridge 0402" 3558.98,-5387.78 r0 top locked (schematic designator SB5)
SB5H "Solder Bridge 0402" "Solder Bridge 0402" 4228.45,-5387.78 r0 top locked (schematic designator SB5)
SB6A "Solder Bridge 0402" "Solder Bridge 0402" -3564.89,-5337.28 r0 top locked (schematic designator SB6)
SB6B "Solder Bridge 0402" "Solder Bridge 0402" -2995.92,-5337.28 r0 top locked (schematic designator SB6)
SB6C "Solder Bridge 0402" "Solder Bridge 0402" -1896.13,-5337.28 r0 top locked (schematic designator SB6)
SB6D "Solder Bridge 0402" "Solder Bridge 0402" 47.35,-5337.28 r0 top locked (schematic designator SB6)
SB6E "Solder Bridge 0402" "Solder Bridge 0402" 2009.52,-5337.28 r0 top locked (schematic designator SB6)
SB6F "Solder Bridge 0402" "Solder Bridge 0402" 2822.23,-5337.29 r0 top locked (schematic designator SB6)
SB6G "Solder Bridge 0402" "Solder Bridge 0402" 3558.98,-5337.28 r0 top locked (schematic designator SB6)
SB6H "Solder Bridge 0402" "Solder Bridge 0402" 4228.45,-5337.28 r0 top locked (schematic designator SB6)
SB7A "Solder Bridge 0402" "Solder Bridge 0402" -3661.89,-4352.78 r90 top locked (schematic designator SB7)
SB7B "Solder Bridge 0402" "Solder Bridge 0402" -3092.92,-4352.78 r90 top locked (schematic designator SB7)
SB7C "Solder Bridge 0402" "Solder Bridge 0402" -1993.13,-4352.78 r90 top locked (schematic designator SB7)
SB7D "Solder Bridge 0402" "Solder Bridge 0402" -49.65,-4352.78 r90 top locked (schematic designator SB7)
SB7E "Solder Bridge 0402" "Solder Bridge 0402" 1912.52,-4352.78 r90 top locked (schematic designator SB7)
SB7F "Solder Bridge 0402" "Solder Bridge 0402" 2725.23,-4352.79 r90 top locked (schematic designator SB7)
SB7G "Solder Bridge 0402" "Solder Bridge 0402" 3461.98,-4352.78 r90 top locked (schematic designator SB7)
SB7H "Solder Bridge 0402" "Solder Bridge 0402" 4131.45,-4352.78 r90 top locked (schematic designator SB7)
SB8A "Solder Bridge 0402" "Solder Bridge 0402" -3341.89,-4555.78 r0 top locked (schematic designator SB8)
SB8B "Solder Bridge 0402" "Solder Bridge 0402" -2772.92,-4555.78 r0 top locked (schematic designator SB8)
SB8C "Solder Bridge 0402" "Solder Bridge 0402" -1673.13,-4555.78 r0 top locked (schematic designator SB8)
SB8D "Solder Bridge 0402" "Solder Bridge 0402" 270.35,-4555.78 r0 top locked (schematic designator SB8)
SB8E "Solder Bridge 0402" "Solder Bridge 0402" 2232.52,-4555.78 r0 top locked (schematic designator SB8)
SB8F "Solder Bridge 0402" "Solder Bridge 0402" 3045.23,-4555.79 r0 top locked (schematic designator SB8)
SB8G "Solder Bridge 0402" "Solder Bridge 0402" 3781.98,-4555.78 r0 top locked (schematic designator SB8)
SB8H "Solder Bridge 0402" "Solder Bridge 0402" 4451.45,-4555.78 r0 top locked (schematic designator SB8)
U1A "AD8221ARZ-R7" SOIC-8 -3469.87,-5169.78 r180 top locked (schematic designator U1)
U1B "AD8221ARZ-R7" SOIC-8 -2900.9,-5169.78 r180 top locked (schematic designator U1)
U1C "AD8221ARZ-R7" SOIC-8 -1801.11,-5169.78 r180 top locked (schematic designator U1)
U1D "AD8221ARZ-R7" SOIC-8 142.37,-5169.78 r180 top locked (schematic designator U1)
U1E "AD8221ARZ-R7" SOIC-8 2104.54,-5169.78 r180 top locked (schematic designator U1)
U1F "AD8221ARZ-R7" SOIC-8 2917.25,-5169.79 r180 top locked (schematic designator U1)
U1G "AD8221ARZ-R7" SOIC-8 3654,-5169.78 r180 top locked (schematic designator U1)
U1H "AD8221ARZ-R7" SOIC-8 4323.47,-5169.78 r180 top locked (schematic designator U1)
U2A "TL084CPWR" 14-TSSOP -3489.87,-4729.78 r180 top locked (schematic designator U2)
U2B "TL084CPWR" 14-TSSOP -2920.9,-4729.78 r180 top locked (schematic designator U2)
U2C "TL084CPWR" 14-TSSOP -1821.11,-4729.78 r180 top locked (schematic designator U2)
U2D "TL084CPWR" 14-TSSOP 122.37,-4729.78 r180 top locked (schematic designator U2)
U2E "TL084CPWR" 14-TSSOP 2084.54,-4729.78 r180 top locked (schematic designator U2)
U2F "TL084CPWR" 14-TSSOP 2897.25,-4729.79 r180 top locked (schematic designator U2)
U2G "TL084CPWR" 14-TSSOP 3634,-4729.78 r180 top locked (schematic designator U2)
U2H "TL084CPWR" 14-TSSOP 4303.47,-4729.78 r180 top locked (schematic designator U2)

## Footprints (in the part's own frame and the unit in brackets; to place one, negate y for a bottom-side part, rotate by r counter-clockwise, add the part's x,y. Pads: shape width x height; smd on the part's side, far side on the other; paste and mask are expansions set on the pad)
14-TSSOP [mm]
  rect 1.05x0.45 smd: 1(-2.775,1.95) 2(-2.775,1.3) 3(-2.775,0.65) 4(-2.775,0) 5(-2.775,-0.65) 6(-2.775,-1.3) 7(-2.775,-1.95) 8(2.775,-1.95) 9(2.775,-1.3) 10(2.775,-0.65) 11(2.775,0) 12(2.775,0.65) 13(2.775,1.3) 14(2.775,1.95)
  silkscreen extent -3.58,-2.54 2.29,2.54, body extent -3.2,-2.5 3.2,2.5, height 1.2
"32 pin Ribbon Pads." [mm]
  rect 0.3x4 smd: 1(7.75,0) 2(7.25,0) 3(6.75,0) 4(6.25,0) 5(5.75,0) 6(5.25,0) 7(4.75,0) 8(4.25,0) 9(3.75,0) 10(3.25,0) 11(2.75,0) 12(2.25,0) 13(1.75,0) 14(1.25,0) 15(0.75,0) 16(0.25,0) 17(-0.25,0) 18(-0.75,0) 19(-1.25,0) 20(-1.75,0) 21(-2.25,0) 22(-2.75,0) 23(-3.25,0) 24(-3.75,0) 25(-4.25,0) 26(-4.75,0) 27(-5.25,0) 28(-5.75,0) 29(-6.25,0) 30(-6.75,0) 31(-7.25,0) 32(-7.75,0)
  silkscreen extent -8.04,-2.54 8.04,2.01
Cap-0402 [mil]
  rect 18x25 smd mask+2.36: 1(-18.5,0) 2(18.5,0)
  silkscreen extent -31,-16 31,16, body extent -20,-10 20,10, height 19
LED-0603 [mm]
  rect 0.5x1 smd: 1(-0.75,0) 2(0.75,0)
  silkscreen extent -1.12,-0.66 1.75,0.66, body extent -0.82,-0.37 0.82,0.36, height 0.68
Res0402 [mil]
  rect 18x25 smd mask+4: 1(-18.5,0) 2(18.5,0)
  silkscreen extent -32,-17 32,16, body extent -23,-11 23,11, height 16
Res-0402 [mil]
  rect 18x25 smd mask+2.17: 1(-18.5,0) 2(18.5,0)
  silkscreen extent -32,-17 32,16, body extent -23,-11 23,11, height 16
sEMG-sensor [mm]
  round 10 smd: 1(0,9.987) 2(0,-9.987)
  oval 10x4.2 smd: 3(0,-0.013)
  silkscreen extent -5.68,-15.21 5.68,15.21
SOD-323 [mm]
  rect 0.8x0.9 smd mask+0.055: 1(-1.15,0) 2(1.15,0)
  silkscreen extent -2.01,-0.79 0.94,0.79, body extent -1.3,-0.67 1.3,0.67, height 1.1
SOIC-8 [mm]
  rect 1.55x0.6 smd: 1(-2.7,1.905) 2(-2.7,0.635) 3(-2.7,-0.635) 4(-2.7,-1.905) 5(2.7,-1.905) 6(2.7,-0.635) 7(2.7,0.635) 8(2.7,1.905)
  silkscreen extent -3.76,-2.49 1.99,2.49, body extent -3,-2.45 3,2.45, height 1.7
"Solder Bridge 0402" [mil]
  rect 18x25 smd mask+2.17: 1(-18.5,0) 2(18.5,0)
  silkscreen extent -32,-17 32,16
TC33X-2-104E_ [mm]
  rect 1.2x1.2 smd: 1(0,0) 3(2,0)
  rect 1.6x1.5 smd: 2(1,2.55)
  silkscreen extent -1.09,-0.71 2.83,3.15, body extent -0.76,-0.64 2.84,3.32, height 1.13
Test-point [mil]
  oct 60x60 smd: 1(0,0)
  silkscreen extent -37,-37 37,37

## Part data
C1A C1B C1C C1D C1E C1F C1G C1H C4A C4B C4C C4D C4E C4F C4G C4H C5A C5B C5C C5D C5E C5F C5G C5H: library part CC0402KRX5R7BB105, "CAP CER 1UF 16V X5R 0402", Case Code (Imperial)=0402, Case Code (Metric)=1005, Dielectric=X5R, LCSC Part Number=C325464, Manufacturer=Yageo, Max Operating Temperature=85°C, Min Operating Temperature=-55°C, Supplier Part Number 1=311-1691-6-ND, Tolerance=10%, Voltage Rating=16V, Capacitance=1uF, Case/Package=0402, ComponentLink1Description=http://www.yageo.com/documents/recent/UPY-GPHC_X5R_4V-to-50V_12.pdf?src-supplier=Avnet+Europe, ComponentLink1URL=http://www.yageo.com/documents/recent/UPY-GPHC_X5R_4V-to-50V_12.pdf?src-supplier=Avnet+Europe, Composition=Ceramic, Depth=0.5mm, Halogen Free="Halogen Free", Height=0.5mm, Item Type=Capacitor, Lead Free="Lead Free", Length=1mm, Manufacturer Part Number=CC0402KRX5R7BB105, Mount="Surface Mount", Packaging="Tape and Reel", Pricing 1="1=0.36, 10=0.252, 100=0.1512, 500=0.1134, 1000=0.09576, 2500=0.09072, 5000=0.08568 (USD)", Radiation Hardening=No, Stock 1=1405667, Supplier 1=Digi-Key, Termination=SMD/SMT, Thickness=0.022inch, Voltage Rating (DC)=16V, Weight=2.3E-05oz, Width=0.02inch
C2A C2B C2C C2D C2E C2F C2G C2H C6A C6B C6C C6D C6E C6F C6G C6H: library part GRM155R71H104ME14D, "CAP CER 0.1UF 50V X7R 0402", Capacitance=100nF, Case/Package=0402, LCSC Part Number=C182412, Manufacturer=Murata, Max Operating Temperature=125°C, Min Operating Temperature=-55°C, Tolerance=20%, Voltage Rating=50V, Category="Ceramic Capacitors", ComponentLink1Description=http://www.mouser.com/ds/2/281/c02e-2905.pdf?src-supplier=Mouser, ComponentLink1URL=http://www.mouser.com/ds/2/281/c02e-2905.pdf?src-supplier=Mouser, ComponentLink2Description=http://search.murata.co.jp/Ceramy/image/img/A01X/G101/ENG/GRM155R71H104ME14-01.pdf?src-supplier=Digi-Key, ComponentLink2URL=http://search.murata.co.jp/Ceramy/image/img/A01X/G101/ENG/GRM155R71H104ME14-01.pdf?src-supplier=Digi-Key, ComponentLink3Description=http://psearch.en.murata.com/capacitor/product/GRM155R71H104ME14%23.pdf?src-supplier=Avnet, ComponentLink3URL=http://psearch.en.murata.com/capacitor/product/GRM155R71H104ME14%23.pdf?src-supplier=Avnet, Item Type=Capacitor, Length=0.039inch, Manufacturer Part Number=GRM155R71H104ME14D, Mount="Surface Mount", Packaging="Cut Tape", Pricing 1="10000=0.00444, 20000=0.00420, 40000=0.00396, 60000=0.00372, 80000=0.00348, 100000=0.00324, 1000000=0.00300 (USD)", RoHS=Yes, RoHS Compliant=Yes, Stock 1=100000, Supplier 1=Avnet, Supplier Part Number 1=GRM155R71H104ME14D, Thickness=0.022inch, Width=0.02inch
C3A C3B C3C C3D C3E C3F C3G C3H: library part CC0402KRX7R9BB103, "CAP CER 10000PF 50V X7R 0402", Case Code (Imperial)=0402, Case Code (Metric)=1005, Dielectric=X7R, LCSC Part Number=C60133, Manufacturer=Yageo, Max Operating Temperature=125°C, Min Operating Temperature=-55°C, Package Quantity=1, Resistor Type=Ceramic, Tolerance=10%, Voltage=50V, Capacitance=10nF, Case/Package=0402, Category="Ceramic Capacitors", ComponentLink1Description=https://datasheet.ciiva.com/11788/0900766b8079c870-11788375.pdf?src-supplier=RSComponents, ComponentLink1URL=https://datasheet.ciiva.com/11788/0900766b8079c870-11788375.pdf?src-supplier=RSComponents, ComponentLink2Description=https://datasheet.ciiva.com/26862/getdatasheetpartid-138248-26862642.pdf?src-supplier=Verical, ComponentLink2URL=https://datasheet.ciiva.com/26862/getdatasheetpartid-138248-26862642.pdf?src-supplier=Verical, ComponentLink3Description=https://datasheet.ciiva.com/7978/1489800-7978093.pdf?src-supplier=Element14, ComponentLink3URL=https://datasheet.ciiva.com/7978/1489800-7978093.pdf?src-supplier=Element14, ComponentLink4Description=https://datasheet.ciiva.com/28450/1489800-28450377.pdf?src-supplier=Element14, ComponentLink4URL=https://datasheet.ciiva.com/28450/1489800-28450377.pdf?src-supplier=Element14, ComponentLink5Description=https://datasheet.ciiva.com/176/mlccorderingcode-176349.pdf?src-supplier=Digi-Key, ComponentLink5URL=https://datasheet.ciiva.com/176/mlccorderingcode-176349.pdf?src-supplier=Digi-Key, ComponentLink6Description=https://datasheet.ciiva.com/176/mlccorderingcode-176348.pdf?src-supplier=Digi-Key, ComponentLink6URL=https://datasheet.ciiva.com/176/mlccorderingcode-176348.pdf?src-supplier=Digi-Key, ComponentLink7Description=https://datasheet.ciiva.com/176/mlccorderingcode-176350.pdf?src-supplier=Digi-Key, ComponentLink7URL=https://datasheet.ciiva.com/176/mlccorderingcode-176350.pdf?src-supplier=Digi-Key, Depth=0.5mm, Halogen Free="Halogen Free", Height=0.5mm, Item Type=Capacitor, Lead Free="Lead Free", Length=1mm, Manufacturer Part Number=CC0402KRX7R9BB103, Mount="Surface Mount", Packaging="Tape and Reel", Pricing 1="10000=0.00178 (USD)", Radiation Hardening=No, Reach SVHC Compliant=Yes, RoHS=Yes, RoHS Compliant=Yes, Series=CC, Stock 1=995000, Supplier 1=Avnet, Supplier Part Number 1=CC0402KRX7R9BB103, Termination=SMD/SMT, Thickness=0.022inch, Voltage Rating=50V, Voltage Rating (DC)=50V, Width=0.02inch
D1A D1B D1C D1D D1E D1F D1G D1H D2A D2B D2C D2D D2E D2F D2G D2H: "100V -55℃~+150℃@(Tj) 400mW Single 1.25V@150mA 4ns 1μA@75V 200mA SOD-323 Switching Diode ROHS", Manufacturer=YFW, ComponentLink1Description=LCSC, ComponentLink1URL=https://lcsc.com/product-detail/Switching-Diode_YFW-1N4148WS_C1884546.html, Manufacturer Part Number=1N4148WS
J1: "Ribbon wire Connection Pads"
LED1A LED1B LED1C LED1D LED1E LED1F LED1G LED1H: library part 19-217/S2C-AQ1R1B/3T, "0603(H=0.4mm) λD=600.5~612.5nm VR=5V VF=1.7V~2.2V IF=25mA PD=60mW", LCSC Part Number=C146215, Manufacturer=Everlight, Supplier Part Number 1=1080-19-217/S2C-AQ1R1B/3TTR-ND, Category=LEDs, ComponentLink1Description=LCSC, ComponentLink1URL=https://www.lcsc.com/product-detail/Light-Emitting-Diodes-LED_Everlight-Elec-19-217-S2C-AQ1R1B-3T_C146215.html, Item Type=LED, Manufacturer Part Number=19-217/S2C-AQ1R1B/3T, RoHS=No, Supplier 1=Digi-Key
P1A P1B P1C P1D P1E P1F P1G P1H: "Sensor Connecting Pads"
P2A P2B P2C P2D P2E P2F P2G P2H P3A P3B P3C P3D P3E P3F P3G P3H: library part "TEST POINT", "Test Point ON", Item Type="TEST POINT"
R1A R1B R1C R1D R1E R1F R1G R1H: library part RC0402FR-07240RL, "RES 240 OHM 1% 1/16W 0402", Case Code (Imperial)=0402, Case Code (Metric)=1005, Manufacturer=Yageo, Max Operating Temperature=155°C, Max Power Dissipation=63mW, Min Operating Temperature=-55°C, Package Quantity=1, Resistance Tolerance=1%, Resistor Type="Thick Film", Supplier Part Number 1=603-RC0402FR-07240RL, Temperature Coefficient=100ppm/°C, Voltage Rating=50V, Case/Package=0402, Category="Chip SMD Resistors", ComponentLink1Description=https://datasheet.ciiva.com/7849/1018594-7849915.pdf?src-supplier=Element14, ComponentLink1URL=https://datasheet.ciiva.com/7849/1018594-7849915.pdf?src-supplier=Element14, ComponentLink2Description=https://datasheet.ciiva.com/7849/1018594-7849916.pdf?src-supplier=Element14, ComponentLink2URL=https://datasheet.ciiva.com/7849/1018594-7849916.pdf?src-supplier=Element14, ComponentLink3Description=https://datasheet.ciiva.com/2519/pyu-r-int-thick-7-2519157.pdf?src-supplier=Digi-Key, ComponentLink3URL=https://datasheet.ciiva.com/2519/pyu-r-int-thick-7-2519157.pdf?src-supplier=Digi-Key, ComponentLink4Description=https://datasheet.ciiva.com/2519/pyu-r-int-thick-7-2519158.pdf?src-supplier=Digi-Key, ComponentLink4URL=https://datasheet.ciiva.com/2519/pyu-r-int-thick-7-2519158.pdf?src-supplier=Digi-Key, ComponentLink5Description=https://datasheet.ciiva.com/2519/pyu-r-int-thick-7-2519156.pdf?src-supplier=Digi-Key, ComponentLink5URL=https://datasheet.ciiva.com/2519/pyu-r-int-thick-7-2519156.pdf?src-supplier=Digi-Key, ComponentLink6Description=https://datasheet.ciiva.com/12669/pyu-rc0402-51-rohs-l-6-r-12669689.pdf?src-supplier=Mouser, ComponentLink6URL=https://datasheet.ciiva.com/12669/pyu-rc0402-51-rohs-l-6-r-12669689.pdf?src-supplier=Mouser, ComponentLink7Description=https://datasheet.ciiva.com/17419/pyu-rc0402-51-rohs-l-6-r-17419482.pdf?src-supplier=Future+Electronics, ComponentLink7URL=https://datasheet.ciiva.com/17419/pyu-rc0402-51-rohs-l-6-r-17419482.pdf?src-supplier=Future+Electronics, Construction=Rectangular, Depth=0.5mm, Features="Moisture Resistant", Height=0.016inch, Lead Free="Lead Free", Length=1mm, Manufacturer Part Number=RC0402FR-07240RL, Military Standard=Not, Number of Terminations=2, Packaging="Tape and Reel", Power Rating=63mW, Pricing 1="1=0.10000, 10=0.01200, 50=0.01200, 100=0.00500, 1000=0.00300, 10000=0.00100 (USD)", REACH SVHC=Unknown, Resistance=240R, RoHS=Yes, RoHS Compliant=Yes, Series=RC, Size Code=0402, Stock 1=1903202, Supplier 1=Mouser, Termination=SMD/SMT, Tolerance=1%, Voltage Rating (DC)=50V, Width=0.02inch
R2A R2B R2C R2D R2E R2F R2G R2H R3A R3B R3C R3D R3E R3F R3G R3H R4A R4B R4C R4D R4E R4F R4G R4H R5A R5B R5C R5D R5E R5F R5G R5H R6A R6B R6C R6D R6E R6F R6G R6H: library part RC0402JR-07150KL, "RES SMD 0402 150kOhm 5% Paper T/R", Case Code (Imperial)=0402, Case Code (Metric)=1005, LCSC Part Number=C137919, Manufacturer=Yageo, Max Operating Temperature=155°C, Max Power Dissipation=63mW, Min Operating Temperature=-55°C, Package Quantity=1, Resistance=150kR, Resistance Tolerance=5%, Resistor Type="Thick Film", Temperature Coefficient=100ppm/°C, Voltage Rating=50V, Case/Package=0402, Category="Chip SMD Resistors", ComponentLink1Description=https://datasheet.ciiva.com/7983/1018594-7983551.pdf?src-supplier=Element14, ComponentLink1URL=https://datasheet.ciiva.com/7983/1018594-7983551.pdf?src-supplier=Element14, ComponentLink2Description=https://datasheet.ciiva.com/2518/pyu-r-int-thick-7-2518929.pdf?src-supplier=Digi-Key, ComponentLink2URL=https://datasheet.ciiva.com/2518/pyu-r-int-thick-7-2518929.pdf?src-supplier=Digi-Key, ComponentLink3Description=https://datasheet.ciiva.com/2518/pyu-r-int-thick-7-2518930.pdf?src-supplier=Digi-Key, ComponentLink3URL=https://datasheet.ciiva.com/2518/pyu-r-int-thick-7-2518930.pdf?src-supplier=Digi-Key, ComponentLink4Description=https://datasheet.ciiva.com/2518/pyu-r-int-thick-7-2518928.pdf?src-supplier=Digi-Key, ComponentLink4URL=https://datasheet.ciiva.com/2518/pyu-r-int-thick-7-2518928.pdf?src-supplier=Digi-Key, ComponentLink5Description=https://datasheet.ciiva.com/7850/1018594-7850149.pdf?src-supplier=Element14, ComponentLink5URL=https://datasheet.ciiva.com/7850/1018594-7850149.pdf?src-supplier=Element14, ComponentLink6Description=https://datasheet.ciiva.com/17072/pyu-rc0402-51-rohs-l-6-r-17072379.pdf?src-supplier=Future+Electronics, ComponentLink6URL=https://datasheet.ciiva.com/17072/pyu-rc0402-51-rohs-l-6-r-17072379.pdf?src-supplier=Future+Electronics, ComponentLink7Description=https://datasheet.ciiva.com/15189/getdatasheetpartid-251830-15189543.pdf?src-supplier=Verical, ComponentLink7URL=https://datasheet.ciiva.com/15189/getdatasheetpartid-251830-15189543.pdf?src-supplier=Verical, Construction=Rectangular, Depth=0.5mm, Features="Moisture Resistant", Height=0.016inch, Item Type=Resistor, Lead Free="Lead Free", Length=1mm, Manufacturer Part Number=RC0402JR-07150KL, Military Standard=Not, Number of Terminations=2, Packaging="Tape and Reel", Power Rating=63mW, Pricing 1="10000=0.00100 (USD)", REACH SVHC="No SVHC", RoHS=Yes, RoHS Compliant=Yes, Series=RC, Size Code=0402, Stock 1=170000, Supplier 1="Arrow Electronics", Supplier Part Number 1=RC0402JR-07150KL, Termination=SMD/SMT, Tolerance=5%, Weight=2.3E-05oz, Width=0.02inch
R7A R7B R7C R7D R7E R7F R7G R7H R8A R8B R8C R8D R8E R8F R8G R8H: library part RC-02W8062FT, "1/16W 50V ±1% ±200ppm/℃ -55℃~+155℃ 80.6kΩ 0402 Chip Resistor - Surface Mount ROHS", Manufacturer=FH, Manufacture Part Number=RC-02W8062FT
R9A R9B R9C R9D R9E R9F R9G R9H: library part TC33X-2-104E, "TRIMMER 100K OHM 0.1W J LEAD TOP", Color=Silver, LCSC Part Number=C719186, Manufacturer=Bourns, Max Operating Temperature=100°C, Max Power Dissipation=100mW, Min Operating Temperature=-40°C, Package Quantity=2500, Resistance=100kR, Resistance Tolerance=25%, Resistor Type=Carbon,Cermet, Temperature Coefficient=250ppm/°C, Voltage Rating (DC)=50V, Category="Variable Resistors and Potentiometers", ComponentLink1Description=https://datasheet.ciiva.com/11832/0900766b802749b3-11832506.pdf?src-supplier=RSComponents, ComponentLink1URL=https://datasheet.ciiva.com/11832/0900766b802749b3-11832506.pdf?src-supplier=RSComponents, ComponentLink2Description=https://datasheet.ciiva.com/8700/tc33-8700395.pdf?src-supplier=Avnet, ComponentLink2URL=https://datasheet.ciiva.com/8700/tc33-8700395.pdf?src-supplier=Avnet, ComponentLink3Description=https://datasheet.ciiva.com/2155/tc33-2155965.pdf?src-supplier=Digi-Key, ComponentLink3URL=https://datasheet.ciiva.com/2155/tc33-2155965.pdf?src-supplier=Digi-Key, ComponentLink4Description=https://datasheet.ciiva.com/7953/1818686-7953181.pdf?src-supplier=Element14, ComponentLink4URL=https://datasheet.ciiva.com/7953/1818686-7953181.pdf?src-supplier=Element14, ComponentLink5Description=https://datasheet.ciiva.com/16716/70155234-16716301.pdf?src-supplier=Allied+Electronics, ComponentLink5URL=https://datasheet.ciiva.com/16716/70155234-16716301.pdf?src-supplier=Allied+Electronics, ComponentLink6Description=https://datasheet.ciiva.com/2155/tc33-2155966.pdf?src-supplier=Digi-Key, ComponentLink6URL=https://datasheet.ciiva.com/2155/tc33-2155966.pdf?src-supplier=Digi-Key, ComponentLink7Description=https://datasheet.ciiva.com/7953/1818686-7953182.pdf?src-supplier=Element14, ComponentLink7URL=https://datasheet.ciiva.com/7953/1818686-7953182.pdf?src-supplier=Element14, ComponentLink8Description=https://datasheet.ciiva.com/2155/tc33-2155967.pdf?src-supplier=Digi-Key, ComponentLink8URL=https://datasheet.ciiva.com/2155/tc33-2155967.pdf?src-supplier=Digi-Key, Depth=3.8mm, Height=0.047inch, Item Type=Trimmer, Length=3mm, Manufacturer Part Number=TC33X-2-104E, Military Standard=Not, Mount="Surface Mount", Number of Turns=1, Packaging="Tape and Reel", Power Rating=100mW, Pricing 1="2500=0.15500, 5000=0.13130 (USD)", Radiation Hardening=No, REACH SVHC="No SVHC", RoHS=Yes, RoHS Compliant=Yes, Series=TC33, Stock 1=12500, Supplier 1="Arrow Electronics", Supplier Part Number 1=TC33X-2-104E, Termination="Foot Print", Tolerance=25%, Weight=29.4mg, Width=0.118inch